# Altium PCB Tablet_Design.PcbDoc (part 4 of 6)
Units mil, origin at the board's own origin, x right, y up, seen from the top; angles counter-clockwise.
Board outline 3823 x 4035 mil, 2 copper layers (Top Layer, Bottom Layer), stack 57 mil thick; 254 components, 256 nets, 1099 pads, 445 vias.
Unrouted connection lines stored in the file: 188.
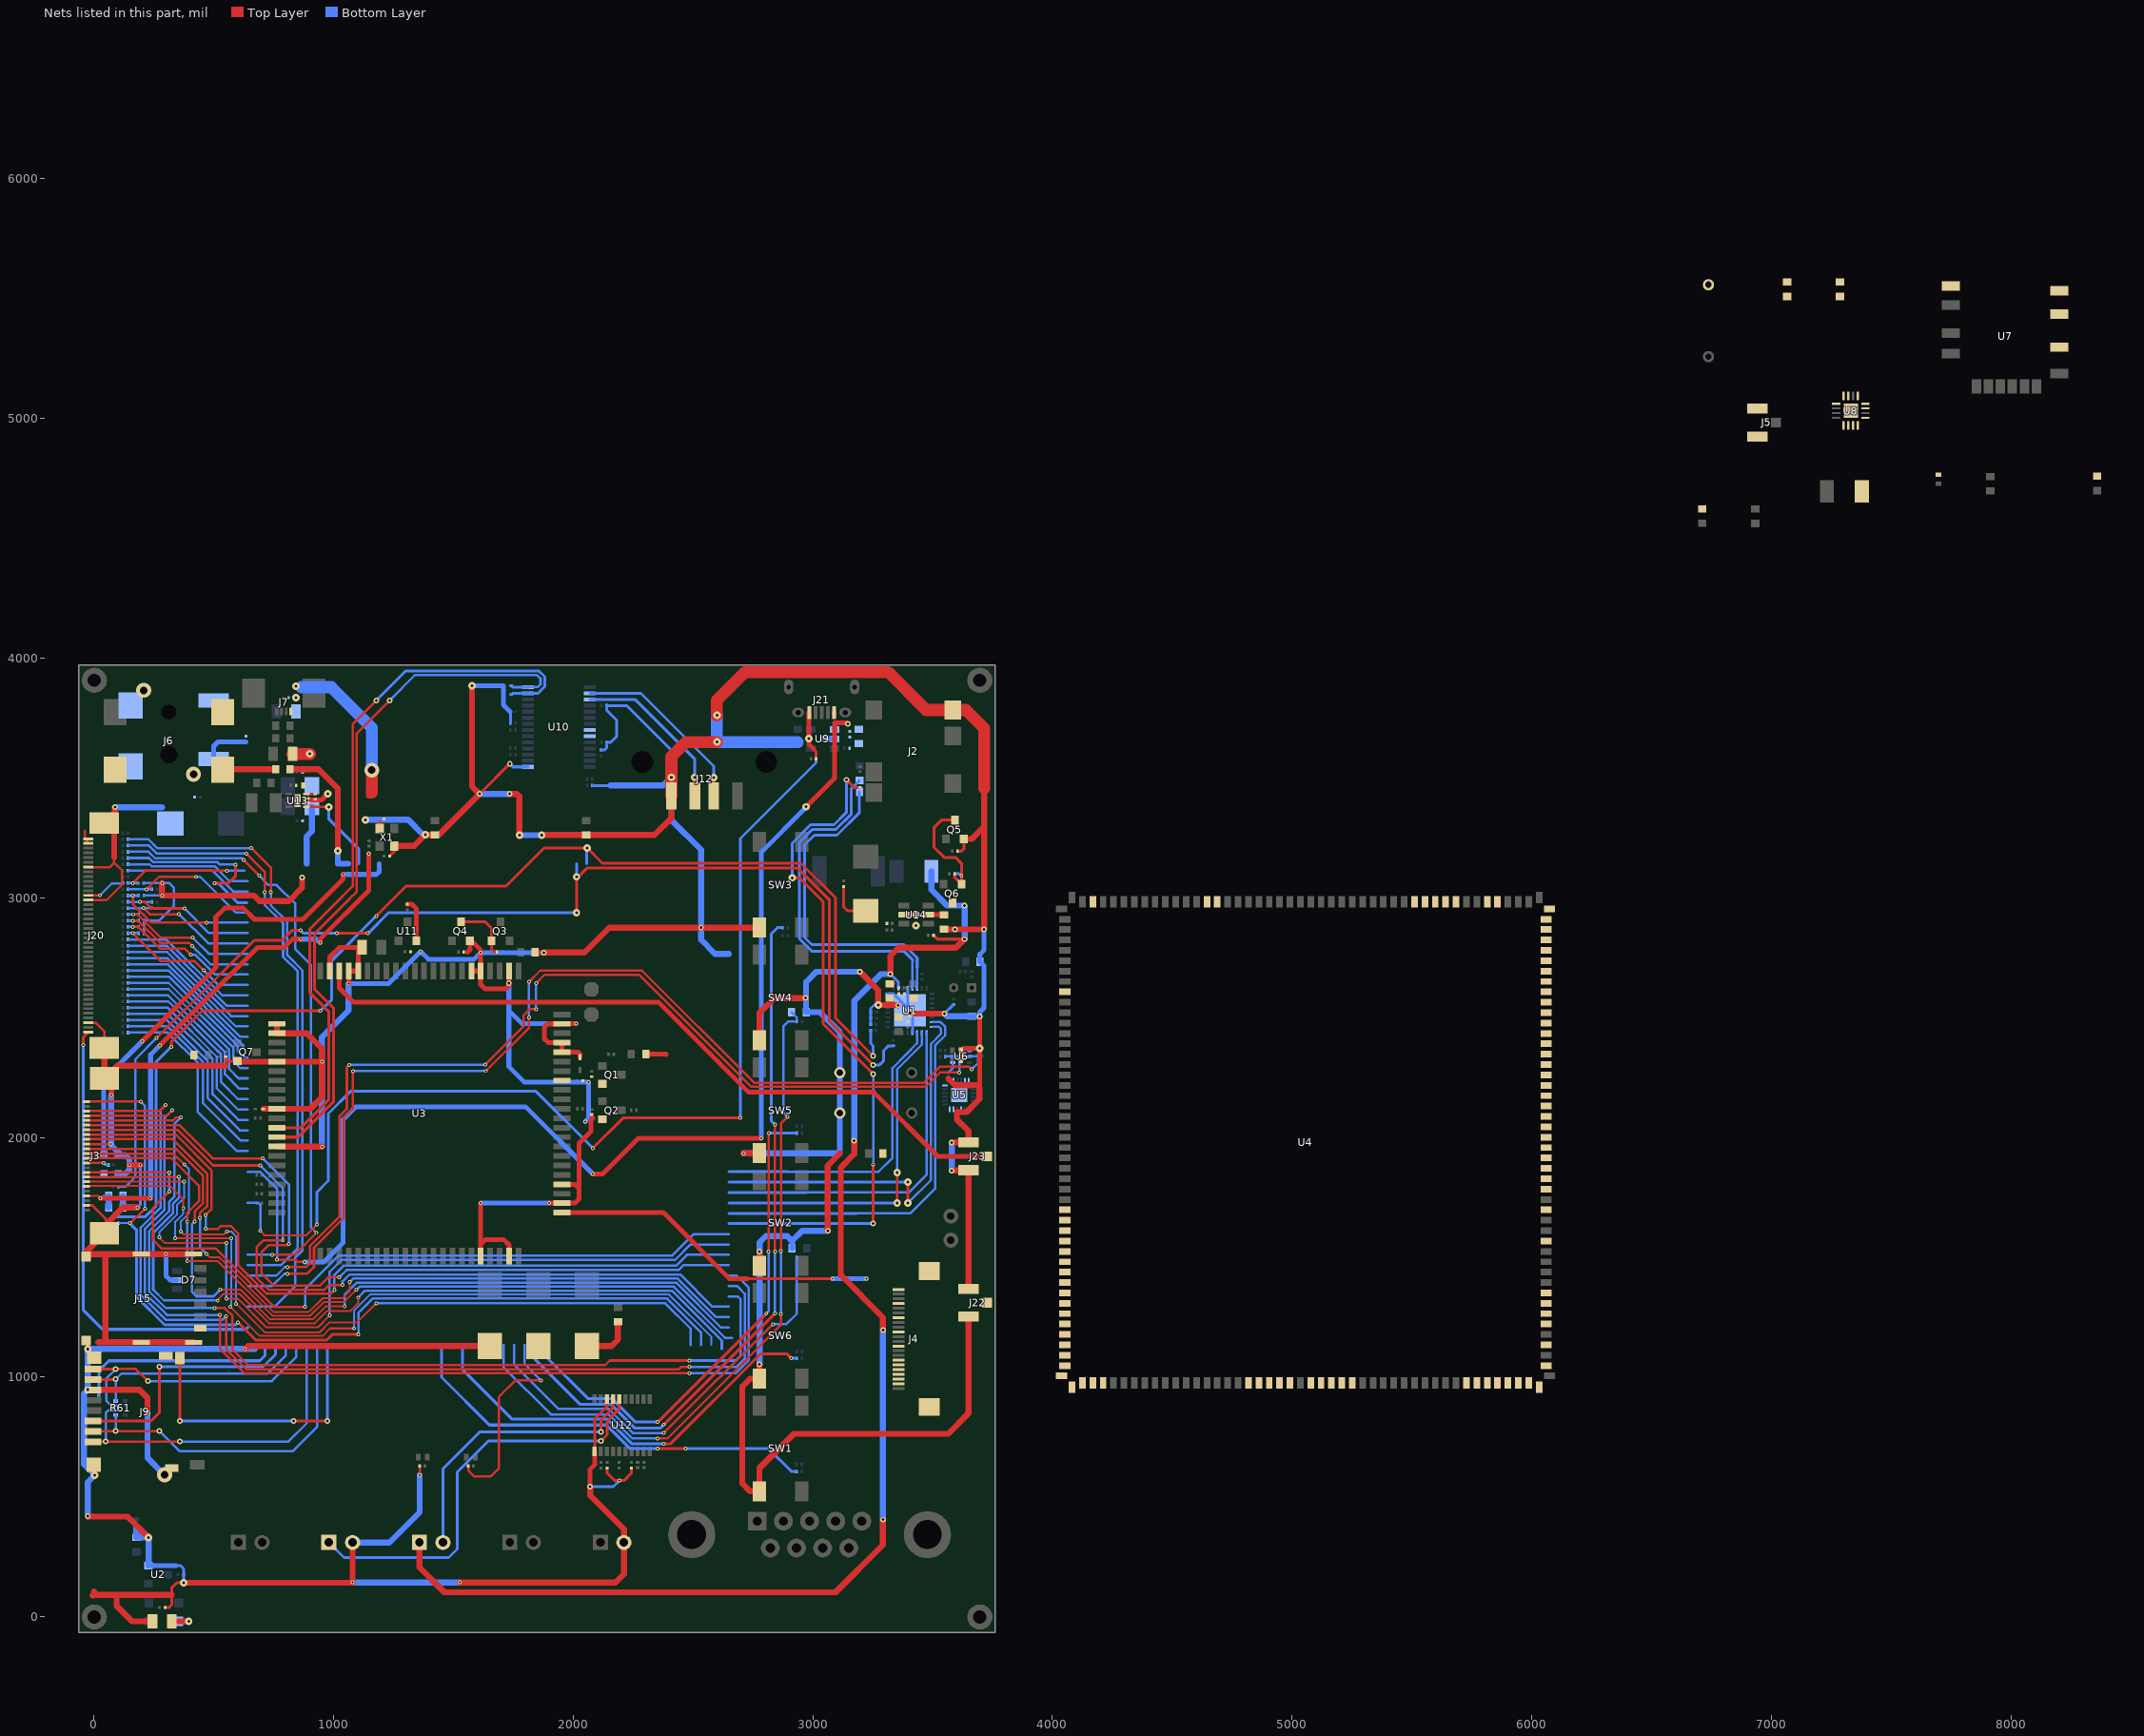
[diagram p2: the nets of this part, all layers, seen from the top]

## Part data (continued)
R7 R8 R9 R15 R17 R28 R31 R34 R36 R39 R69 R74 R89 R91 R93 R95 R97 R99 R101 R103 R131: library part RC0201FR-0710KL, "RES SMD 10K OHM 1% 1/20W 0201", Case/Package=0201, Case Code (Metric)=0603, Manufacturer=Yageo, Max Operating Temperature=125°C, Max Power Dissipation=50mW, Min Operating Temperature=-55°C, Package Quantity=1, Resistance=10kR, Supplier Part Number 1=311-10.0KMCT-ND, Temperature Coefficient=200ppm/°C, Tolerance=1%, Voltage Rating=25V, Case Code (Imperial)=0201, ComponentLink1Description=http://www.yageo.com/documents/recent/PYu-RC_Group_51_RoHS_L_10.pdf?src-supplier=Digi-Key, ComponentLink1URL=http://www.yageo.com/documents/recent/PYu-RC_Group_51_RoHS_L_10.pdf?src-supplier=Digi-Key, ComponentLink2Description=http://www.farnell.com/datasheets/2167052.pdf?src-supplier=Element14, ComponentLink2URL=http://www.farnell.com/datasheets/2167052.pdf?src-supplier=Element14, ComponentLink3Description=http://www.yageo.com/documents/recent/PYu-RC0201_51_RoHS_L_8.pdf?src-supplier=Avnet, ComponentLink3URL=http://www.yageo.com/documents/recent/PYu-RC0201_51_RoHS_L_8.pdf?src-supplier=Avnet, ComponentLink4Description=http://www.yageo.com/documents/recent/PYu-RC0201_51_RoHS_L_8.pdf?src-supplier=Avnet+Europe, ComponentLink4URL=http://www.yageo.com/documents/recent/PYu-RC0201_51_RoHS_L_8.pdf?src-supplier=Avnet+Europe, ComponentLink5Description=https://www.verical.com/server-webapp/html/getDatasheet?partID=421074&src-supplier=Verical, ComponentLink5URL=https://www.verical.com/server-webapp/html/getDatasheet?partID=421074&src-supplier=Verical, ComponentLink6Description=http://www.farnell.com/datasheets/1421516.pdf?src-supplier=Element14, ComponentLink6URL=http://www.farnell.com/datasheets/1421516.pdf?src-supplier=Element14, Composition="Thick Film", Contact Plating=Tin,Matte, Depth=0.3mm, Features="Moisture Resistant", Height=0.01inch, Lead Free="Lead Free", Length=0.6mm, Manufacturer Part Number=RC0201FR-0710KL, Military Standard=Not, Number of Pins=2, Number of Terminations=2, Packaging="Tape and Reel", Power Rating=50mW, Pricing 1="1=0.1, 10=0.042, 100=0.0171, 1000=0.00768, 2500=0.00666, 5000=0.00551 (USD)", Radiation Hardening=No, REACH SVHC="No SVHC", Stock 1=12729696, Supplier 1=Digi-Key, Termination=SMD/SMT, Voltage Rating (DC)=25V, Weight=6E-06oz, Width=0.3mm, Working Voltage=25V
R11 R16 R70 R135: library part RC0201JR-0747KL, "RES SMD 47K OHM 5% 1/20W 0201", Case/Package=0201, Case Code (Metric)=0603, Manufacturer=Yageo, Max Operating Temperature=125°C, Max Power Dissipation=50mW, Min Operating Temperature=-55°C, Package Quantity=10000, Resistance=47kR, Resistance Tolerance=5%, Resistor Type="Thick Film", Supplier Part Number 1=311-47KNCT-ND, Temperature Coefficient=200ppm/°C, Voltage Rating=25V, Case Code (Imperial)=0201, Category="Chip SMD Resistors", ComponentLink1Description=https://datasheet.ciiva.com/2492/pyu-r-int-thick-7-2492966.pdf?src-supplier=Digi-Key, ComponentLink1URL=https://datasheet.ciiva.com/2492/pyu-r-int-thick-7-2492966.pdf?src-supplier=Digi-Key, ComponentLink2Description=https://datasheet.ciiva.com/5989/1563626-5989624.pdf?src-supplier=Farnell, ComponentLink2URL=https://datasheet.ciiva.com/5989/1563626-5989624.pdf?src-supplier=Farnell, ComponentLink3Description=https://datasheet.ciiva.com/28399/pyu-rc0201-51-rohs-l-8-28399338.pdf?src-supplier=Avnet+Europe, ComponentLink3URL=https://datasheet.ciiva.com/28399/pyu-rc0201-51-rohs-l-8-28399338.pdf?src-supplier=Avnet+Europe, ComponentLink4Description=https://datasheet.ciiva.com/8889/pyu-rc0201-51-rohs-l-8-8889071.pdf?src-supplier=Avnet, ComponentLink4URL=https://datasheet.ciiva.com/8889/pyu-rc0201-51-rohs-l-8-8889071.pdf?src-supplier=Avnet, ComponentLink5Description=https://datasheet.ciiva.com/2492/pyu-r-int-thick-7-2492965.pdf?src-supplier=Digi-Key, ComponentLink5URL=https://datasheet.ciiva.com/2492/pyu-r-int-thick-7-2492965.pdf?src-supplier=Digi-Key, ComponentLink6Description=https://datasheet.ciiva.com/2492/pyu-r-int-thick-7-2492967.pdf?src-supplier=Digi-Key, ComponentLink6URL=https://datasheet.ciiva.com/2492/pyu-r-int-thick-7-2492967.pdf?src-supplier=Digi-Key, ComponentLink7Description=https://datasheet.ciiva.com/16855/pyu-rc0201-51-rohs-l-8-16855517.pdf?src-supplier=Avnet+Europe, ComponentLink7URL=https://datasheet.ciiva.com/16855/pyu-rc0201-51-rohs-l-8-16855517.pdf?src-supplier=Avnet+Europe, Construction=Rectangular, Contact Plating=Tin,Matte, Depth=0.3mm, Features="Moisture Resistant", Height=0.01inch, Lead Free="Lead Free", Length=0.6mm, Manufacturer Part Number=RC0201JR-0747KL, Military Standard=Not, Number of Pins=2, Number of Terminations=2, Packaging="Tape and Reel", Power Rating=50mW, Pricing 1="1=0.10000, 10=0.02800, 100=0.01140, 1000=0.00513, 2500=0.00445, 5000=0.00368 (USD)", Radiation Hardening=No, REACH SVHC="No SVHC", RoHS=Yes, RoHS Compliant=Yes, Series=RC, Stock 1=472205, Supplier 1=Digi-Key, Technology="THICK FILM", Termination=SMD/SMT, Tolerance=5%, Voltage Rating (DC)=25V, Width=0.3mm, Working Voltage=25V
R13 R134: library part RMCF0201FT4K70, "RES 4.7K OHM 1% 1/20W 0201", Case/Package=0201, Case Code (Metric)=0603, Manufacturer="Stackpole Electronics", Max Operating Temperature=125°C, Max Power Dissipation=50mW, Min Operating Temperature=-55°C, Resistance=4.7kR, Resistor Type="Thick Film", Supplier Part Number 1=RMCF0201FT4K70CT-ND, Temperature Coefficient=200ppm/°C, Tolerance=1%, Case Code (Imperial)=0201, Category="Chip SMD Resistors", ComponentLink1Description=https://www.seielect.com/catalog/SEI-Packaging.pdf?src-supplier=Digi-Key, ComponentLink1URL=https://www.seielect.com/catalog/SEI-Packaging.pdf?src-supplier=Digi-Key, ComponentLink2Description=https://www.seielect.com/catalog/SEI-RMCF_RMCP.pdf?src-supplier=Avnet, ComponentLink2URL=https://www.seielect.com/catalog/SEI-RMCF_RMCP.pdf?src-supplier=Avnet, Contact Plating=Tin,Matte, Height=0.009inch, Length=0.024inch, Manufacturer Part Number=RMCF0201FT4K70, Mount="Surface Mount", Number of Terminations=2, Packaging="Tape and Reel", Pricing 1="1=0.10000, 10=0.02300, 100=0.00940, 1000=0.00424, 2500=0.00368, 5000=0.00304 (USD)", Radiation Hardening=No, RoHS=Yes, Stock 1=325193, Supplier 1=Digi-Key, Width=0.012inch
R14: library part ERJ-1GNJ301C, "RES SMD 300 OHM 5% 1/20W 0201", Case/Package=0201, Case Code (Metric)=0603, Manufacturer=Panasonic, Max Operating Temperature=125°C, Max Power Dissipation=50mW, Min Operating Temperature=-55°C, Package Quantity=15000, Resistor Type="Thick Film", Supplier Part Number 1=P123298CT-ND, Temperature Coefficient=200ppm/°C, Tolerance=5%, Voltage Rating=25V, Case Code (Imperial)=0201, Category="Chip SMD Resistors", ComponentLink1Description=http://www.mouser.com/ds/2/315/AOA0000C84-947596.pdf?src-supplier=Mouser, ComponentLink1URL=http://www.mouser.com/ds/2/315/AOA0000C84-947596.pdf?src-supplier=Mouser, ComponentLink2Description=http://www.onlinecomponents.com/datasheet/erj-1gnj301c.aspx?p=44467777&src-supplier=Onlinecomponents.com, ComponentLink2URL=http://www.onlinecomponents.com/datasheet/erj-1gnj301c.aspx?p=44467777&src-supplier=Onlinecomponents.com, ComponentLink3Description=https://industrial.panasonic.com/cdbs/www-data/pdf/RDM0000/DMM0000COL11.pdf?src-supplier=Digi-Key, ComponentLink3URL=https://industrial.panasonic.com/cdbs/www-data/pdf/RDM0000/DMM0000COL11.pdf?src-supplier=Digi-Key, ComponentLink4Description=https://b2b-api.panasonic.eu/file_stream/pids/fileversion/1242?src-supplier=Digi-Key, ComponentLink4URL=https://b2b-api.panasonic.eu/file_stream/pids/fileversion/1242?src-supplier=Digi-Key, ComponentLink5Description=http://industrial.panasonic.com/www-cgi/jvcr13pz.cgi?E+PZ+3+AOA0002+ERJ1GNJ301C+7+WW?src-supplier=Digi-Key, ComponentLink5URL=http://industrial.panasonic.com/www-cgi/jvcr13pz.cgi?E+PZ+3+AOA0002+ERJ1GNJ301C+7+WW?src-supplier=Digi-Key, Contact Plating=Tin, Height=0.01inch, Length=0.024inch, Manufacturer Part Number=ERJ-1GNJ301C, Mount="Surface Mount", Number of Terminations=2, Packaging="Tape and Reel", Power Rating=50mW, Pricing 1="1=0.10000, 10=0.02800, 100=0.01150, 1000=0.00518, 2500=0.00450, 5000=0.00371 (USD)", Resistance=300R, RoHS=Yes, Stock 1=65293, Supplier 1=Digi-Key, Termination=SMD/SMT, Weight=6E-06oz, Width=0.012inch
R18 R68 R73 R128 R130 R133: library part RC0201JR-07100KL, "RES SMD 100K OHM 5% 1/20W 0201"
R19 R132: library part AC0201FR-075K1L, "RES SMD 5.1K OHM 1% 1/20W 0201", Case/Package=0201, Manufacturer=Yageo, Max Operating Temperature=155°C, Max Power Dissipation=50mW, Min Operating Temperature=-55°C, Resistance=5.1kR, Resistor Type="Thick Film", Supplier Part Number 1=YAG5228CT-ND, Temperature Coefficient=200ppm/°C, Tolerance=1%, Category="Chip SMD Resistors", ComponentLink1Description=http://www.yageo.com/NewPortal/yageodocoutput?fileName=/pdf/R-Chip/PYu-AC_51_RoHS_L_6.pdf&src-supplier=Digi-Key, ComponentLink1URL=http://www.yageo.com/NewPortal/yageodocoutput?fileName=/pdf/R-Chip/PYu-AC_51_RoHS_L_6.pdf&src-supplier=Digi-Key, ComponentLink2Description=http://www.yageo.com/NewPortal/yageodocoutput?fileName=/pdf/R-Chip/PYu-AC_51_RoHS_L_5.pdf&src-supplier=Digi-Key, ComponentLink2URL=http://www.yageo.com/NewPortal/yageodocoutput?fileName=/pdf/R-Chip/PYu-AC_51_RoHS_L_5.pdf&src-supplier=Digi-Key, Features="Moisture Resistant,Automotive AEC-Q200", Height=0.01inch, Length=0.024inch, Manufacturer Part Number=AC0201FR-075K1L, Number of Terminations=2, Packaging="Tape and Reel", Pricing 1="1=0.10000, 10=0.06300, 100=0.02560, 1000=0.01149, 2500=0.00997, 5000=0.00823 (USD)", RoHS=Yes, RoHS Compliant=Yes, Stock 1=2998, Supplier 1=Digi-Key, Width=0.012inch
R23 R82: library part RC0201JR-07470RL, "RES SMD 470 OHM 5% 1/20W 0201", Case/Package=0201, Case Code (Metric)=0603, Manufacturer=Yageo, Max Operating Temperature=125°C, Max Power Dissipation=50mW, Min Operating Temperature=-55°C, Package Quantity=1, Supplier Part Number 1=311-470NCT-ND, Temperature Coefficient=200ppm/°C, Tolerance=5%, Voltage Rating=25V, Case Code (Imperial)=0201, ComponentLink1Description=http://www.farnell.com/datasheets/443682.pdf?src-supplier=Farnell, ComponentLink1URL=http://www.farnell.com/datasheets/443682.pdf?src-supplier=Farnell, ComponentLink2Description=http://www.yageo.com/documents/recent/PYu-RC0201_51_RoHS_L_8.pdf?src-supplier=Avnet, ComponentLink2URL=http://www.yageo.com/documents/recent/PYu-RC0201_51_RoHS_L_8.pdf?src-supplier=Avnet, ComponentLink3Description=http://www.yageo.com/documents/recent/PYu-RC_Group_51_RoHS_L_9.pdf?src-supplier=Digi-Key, ComponentLink3URL=http://www.yageo.com/documents/recent/PYu-RC_Group_51_RoHS_L_9.pdf?src-supplier=Digi-Key, ComponentLink4Description=http://www.yageo.com/documents/recent/PYu-RC_Group_51_RoHS_L_10.pdf?src-supplier=Digi-Key, ComponentLink4URL=http://www.yageo.com/documents/recent/PYu-RC_Group_51_RoHS_L_10.pdf?src-supplier=Digi-Key, ComponentLink5Description=http://www.yageo.com.tw/exep/pages/download/literatures/PYu-R_INT-thick_7.pdf?src-supplier=Digi-Key, ComponentLink5URL=http://www.yageo.com.tw/exep/pages/download/literatures/PYu-R_INT-thick_7.pdf?src-supplier=Digi-Key, ComponentLink6Description=http://www.yageo.com/documents/recent/PYu-RC0201_51_RoHS_L_8.pdf?src-supplier=Avnet+Europe, ComponentLink6URL=http://www.yageo.com/documents/recent/PYu-RC0201_51_RoHS_L_8.pdf?src-supplier=Avnet+Europe, Composition="Thick Film", Contact Plating=Tin,Matte, Depth=0.3mm, Features="Moisture Resistant", Height=0.01inch, Lead Free="Lead Free", Length=0.6mm, Manufacturer Part Number=RC0201JR-07470RL, Military Standard=Not, Number of Pins=2, Number of Terminations=2, Packaging="Tape and Reel", Power Rating=50mW, Pricing 1="1=0.1, 10=0.028, 100=0.0115, 1000=0.00517, 2500=0.00448, 5000=0.00371 (USD)", Radiation Hardening=No, REACH SVHC="No SVHC", Resistance=470R, Stock 1=101994, Supplier 1=Digi-Key, Termination=SMD/SMT, Voltage Rating (DC)=25V, Width=0.3mm
R27: library part AC0201FR-0733RL, "RES SMD 33 OHM 1% 1/20W 0201", Case/Package=0201, Case Code (Metric)=0603, Manufacturer=Yageo, Max Operating Temperature=155°C, Max Power Dissipation=50mW, Min Operating Temperature=-55°C, Resistor Type="Thick Film", Supplier Part Number 1=YAG3424CT-ND, Temperature Coefficient=200ppm/°C, Tolerance=1%, Case Code (Imperial)=0201, Category="Chip SMD Resistors", ComponentLink1Description=http://www.yageo.com/NewPortal/yageodocoutput?fileName=/pdf/R-Chip/PYu-AC_51_RoHS_L_6.pdf&src-supplier=Digi-Key, ComponentLink1URL=http://www.yageo.com/NewPortal/yageodocoutput?fileName=/pdf/R-Chip/PYu-AC_51_RoHS_L_6.pdf&src-supplier=Digi-Key, Features="Moisture Resistant,Automotive AEC-Q200", Height=0.01inch, Length=0.024inch, Manufacturer Part Number=AC0201FR-0733RL, Number of Terminations=2, Packaging="Tape and Reel", Pricing 1="1=0.10000, 10=0.06300, 100=0.02560, 1000=0.01149, 2500=0.00997, 5000=0.00823 (USD)", Resistance=33R, RoHS=Yes, RoHS Compliant=Yes, Stock 1=119363, Supplier 1=Digi-Key, Width=0.012inch
R38 R40: library part AC0201JR-072K2L, "RES SMD 2.2K OHM 5% 1/20W 0201", Case/Package=0201, Case Code (Metric)=0603, Manufacturer=Yageo, Max Operating Temperature=155°C, Max Power Dissipation=50mW, Min Operating Temperature=-55°C, Resistance=2.2kR, Resistor Type="Thick Film", Supplier Part Number 1=YAG3433CT-ND, Temperature Coefficient=200ppm/°C, Tolerance=5%, Case Code (Imperial)=0201, Category="Chip SMD Resistors", ComponentLink1Description=http://www.yageo.com/NewPortal/yageodocoutput?fileName=/pdf/R-Chip/PYu-AC_51_RoHS_L_6.pdf&src-supplier=Digi-Key, ComponentLink1URL=http://www.yageo.com/NewPortal/yageodocoutput?fileName=/pdf/R-Chip/PYu-AC_51_RoHS_L_6.pdf&src-supplier=Digi-Key, Features="Moisture Resistant,Automotive AEC-Q200", Height=0.01inch, Length=0.024inch, Manufacturer Part Number=AC0201JR-072K2L, Number of Terminations=2, Packaging="Tape and Reel", Pricing 1="1=0.10000, 10=0.04700, 100=0.01910, 1000=0.00860, 2500=0.00746, 5000=0.00617 (USD)", RoHS=Yes, RoHS Compliant=Yes, Stock 1=106991, Supplier 1=Digi-Key, Width=0.012inch
R61: library part CAY10-473J4LF, "RES ARRAY 4 RES 47K OHM 0804", Case/Package=0804, Case Code (Metric)=2010, Manufacturer=Bourns, Max Operating Temperature=125°C, Min Operating Temperature=-55°C, Number of Resistors=4, Package Quantity=1, Power Per Element=62.5mW, Power Rating=125mW, Resistance=47kR, Resistance Tolerance=5%, Supplier Part Number 1=CAY10-473J4LFCT-ND, Temperature Coefficient=250ppm/°C, Voltage Rating=25V, Case Code (Imperial)=0804, Category="Resistor Arrays", Circuit Type=Isolated, ComponentLink1Description=https://datasheet.ciiva.com/11807/0900766b8064e463-11807137.pdf?src-supplier=RSComponents, ComponentLink1URL=https://datasheet.ciiva.com/11807/0900766b8064e463-11807137.pdf?src-supplier=RSComponents, ComponentLink2Description=https://datasheet.ciiva.com/6494/cay10-6494182.pdf?src-supplier=Digi-Key, ComponentLink2URL=https://datasheet.ciiva.com/6494/cay10-6494182.pdf?src-supplier=Digi-Key, ComponentLink3Description=https://datasheet.ciiva.com/16965/cay10-16965867.pdf?src-supplier=Avnet+Europe, ComponentLink3URL=https://datasheet.ciiva.com/16965/cay10-16965867.pdf?src-supplier=Avnet+Europe, ComponentLink4Description=https://datasheet.ciiva.com/22712/467939-22712716.pdf?src-supplier=Element14, ComponentLink4URL=https://datasheet.ciiva.com/22712/467939-22712716.pdf?src-supplier=Element14, ComponentLink5Description=https://datasheet.ciiva.com/6494/cay10-6494183.pdf?src-supplier=Digi-Key, ComponentLink5URL=https://datasheet.ciiva.com/6494/cay10-6494183.pdf?src-supplier=Digi-Key, ComponentLink6Description=https://datasheet.ciiva.com/6494/cay10-6494184.pdf?src-supplier=Digi-Key, ComponentLink6URL=https://datasheet.ciiva.com/6494/cay10-6494184.pdf?src-supplier=Digi-Key, ComponentLink7Description=https://datasheet.ciiva.com/8370/cay10-8370974.pdf?src-supplier=Avnet, ComponentLink7URL=https://datasheet.ciiva.com/8370/cay10-8370974.pdf?src-supplier=Avnet, ComponentLink8Description=https://datasheet.ciiva.com/48692/001055368-da-01-en-wid-arr-cay10-473j4lf-47k-ohm-4-w-0804-48692103.pdf?src-supplier=Conrad, ComponentLink8URL=https://datasheet.ciiva.com/48692/001055368-da-01-en-wid-arr-cay10-473j4lf-47k-ohm-4-w-0804-48692103.pdf?src-supplier=Conrad, Contact Plating=Tin, Depth=1mm, Height=0.018inch, Length=2mm, Manufacturer Part Number=CAY10-473J4LF, Military Standard=Not, Mount="Surface Mount", Number of Elements=4, Number of Pins=8, Number of Terminals/Pins=8, Packaging="Tape and Reel", Pricing 1="1=0.12000, 10=0.10400, 25=0.07200, 50=0.05600, 100=0.04000, 250=0.03120, 500=0.02480, 1000=0.01760, 5000=0.01360 (USD)", REACH SVHC="No SVHC", RoHS=Yes, RoHS Compliant=Yes, Series=CAY10, Stock 1=11037, Supplier 1=Digi-Key, Technology="THICK FILM", Terminal Pitch=0.5mm, Termination=Convex, Tolerance=5%, Voltage Rating (DC)=25V, Width=0.039inch
R66: library part AC0201FR-076K8L, "RES SMD 6.8K OHM 1% 1/20W 0201", Case/Package=0201, Manufacturer=Yageo, Max Operating Temperature=155°C, Max Power Dissipation=50mW, Min Operating Temperature=-55°C, Resistance=6.8kR, Resistor Type="Thick Film", Supplier Part Number 1=YAG5238CT-ND, Temperature Coefficient=200ppm/°C, Tolerance=1%, Category="Chip SMD Resistors", ComponentLink1Description=http://www.yageo.com/NewPortal/yageodocoutput?fileName=/pdf/R-Chip/PYu-AC_51_RoHS_L_6.pdf&src-supplier=Digi-Key, ComponentLink1URL=http://www.yageo.com/NewPortal/yageodocoutput?fileName=/pdf/R-Chip/PYu-AC_51_RoHS_L_6.pdf&src-supplier=Digi-Key, ComponentLink2Description=http://www.yageo.com/NewPortal/yageodocoutput?fileName=/pdf/R-Chip/PYu-AC_51_RoHS_L_5.pdf&src-supplier=Digi-Key, ComponentLink2URL=http://www.yageo.com/NewPortal/yageodocoutput?fileName=/pdf/R-Chip/PYu-AC_51_RoHS_L_5.pdf&src-supplier=Digi-Key, Features="Moisture Resistant,Automotive AEC-Q200", Height=0.01inch, Length=0.024inch, Manufacturer Part Number=AC0201FR-076K8L, Number of Terminations=2, Packaging="Tape and Reel", Pricing 1="1=0.10000, 10=0.06300, 100=0.02560, 1000=0.01149, 2500=0.00997, 5000=0.00823 (USD)", RoHS=Yes, RoHS Compliant=Yes, Stock 1=17901, Supplier 1=Digi-Key, Width=0.012inch
R67: library part RC0201FR-071KL, "RES SMD 1K OHM 1% 1/20W 0201", Case/Package=0201, Case Code (Metric)=0603, Manufacturer=Yageo, Max Operating Temperature=125°C, Max Power Dissipation=50mW, Min Operating Temperature=-55°C, Package Quantity=10000, Resistance=1kR, Supplier Part Number 1=311-1KMCT-ND, Temperature Coefficient=200ppm/°C, Tolerance=1%, Voltage Rating=25V, Case Code (Imperial)=0201, ComponentLink1Description=http://www.yageo.com/documents/recent/PYu-RC0201_51_RoHS_L_8.pdf?src-supplier=Avnet+Europe, ComponentLink1URL=http://www.yageo.com/documents/recent/PYu-RC0201_51_RoHS_L_8.pdf?src-supplier=Avnet+Europe, ComponentLink2Description=http://www.farnell.com/datasheets/2167052.pdf?src-supplier=Element14, ComponentLink2URL=http://www.farnell.com/datasheets/2167052.pdf?src-supplier=Element14, ComponentLink3Description=http://www.yageo.com/documents/recent/PYu-RC_Group_51_RoHS_L_10.pdf?src-supplier=Digi-Key, ComponentLink3URL=http://www.yageo.com/documents/recent/PYu-RC_Group_51_RoHS_L_10.pdf?src-supplier=Digi-Key, ComponentLink4Description=http://www.yageo.com/documents/recent/PYu-RC0201_51_RoHS_L_8.pdf?src-supplier=Avnet, ComponentLink4URL=http://www.yageo.com/documents/recent/PYu-RC0201_51_RoHS_L_8.pdf?src-supplier=Avnet, Composition="Thick Film", Contact Plating=Tin,Matte, Depth=0.3mm, Features="Moisture Resistant", Height=0.01inch, Lead Free="Lead Free", Length=0.024inch, Manufacturer Part Number=RC0201FR-071KL, Military Standard=Not, Number of Terminations=2, Packaging="Tape and Reel", Power Rating=50mW, Pricing 1="1=0.1, 10=0.04, 100=0.0165, 1000=0.00739, 2500=0.00642, 5000=0.0053 (USD)", Radiation Hardening=No, REACH SVHC=Unknown, Stock 1=3437969, Supplier 1=Digi-Key, Termination=SMD/SMT, Width=0.012inch, Working Voltage=25V
R72: library part RC0201FR-07510KL, "RES SMD 510K OHM 1% 1/20W 0201", Case/Package=0201, Case Code (Metric)=0603, Manufacturer=Yageo, Max Operating Temperature=125°C, Max Power Dissipation=50mW, Min Operating Temperature=-55°C, Resistance=510kR, Resistor Type="Thick Film", Supplier Part Number 1=YAG2713CT-ND, Temperature Coefficient=200ppm/°C, Tolerance=1%, Case Code (Imperial)=0201, Category="Chip SMD Resistors", ComponentLink1Description=http://components.arrow.com/part/dataview/0323_03301050?src-supplier=Arrow+Europe, ComponentLink1URL=http://components.arrow.com/part/dataview/0323_03301050?src-supplier=Arrow+Europe, ComponentLink2Description=http://www.yageo.com.tw/exep/pages/download/literatures/PYu-R_INT-thick_7.pdf?src-supplier=Digi-Key, ComponentLink2URL=http://www.yageo.com.tw/exep/pages/download/literatures/PYu-R_INT-thick_7.pdf?src-supplier=Digi-Key, ComponentLink3Description=http://www.yageo.com/documents/recent/PYu-RC_Group_51_RoHS_L_9.pdf?src-supplier=Digi-Key, ComponentLink3URL=http://www.yageo.com/documents/recent/PYu-RC_Group_51_RoHS_L_9.pdf?src-supplier=Digi-Key, Depth=0.3mm, Features="Moisture Resistant", Height=0.01inch, Lead Free="Lead Free", Length=0.024inch, Manufacturer Part Number=RC0201FR-07510KL, Military Standard=Not, Number of Terminations=2, Packaging="Tape and Reel", Pricing 1="1=0.10000, 10=0.04000, 100=0.01630, 1000=0.00732, 2500=0.00635, 5000=0.00525 (USD)", RoHS=Yes, RoHS Compliant=Yes, Stock 1=1654, Supplier 1=Digi-Key, Width=0.012inch
R75: library part RC0201FR-0720KL, "RES SMD 20K OHM 1% 1/20W 0201", Case/Package=0201, Case Code (Metric)=0603, Manufacturer=Yageo, Max Operating Temperature=125°C, Max Power Dissipation=50mW, Min Operating Temperature=-55°C, Package Quantity=10000, Resistance=20kR, Supplier Part Number 1=YAG2276CT-ND, Temperature Coefficient=200ppm/°C, Tolerance=1%, Voltage Rating=25V, Case Code (Imperial)=0201, ComponentLink1Description=http://www.yageo.com.tw/exep/pages/download/literatures/PYu-R_INT-thick_7.pdf?src-supplier=Digi-Key, ComponentLink1URL=http://www.yageo.com.tw/exep/pages/download/literatures/PYu-R_INT-thick_7.pdf?src-supplier=Digi-Key, Composition="Thick Film", Depth=0.3mm, Features="Moisture Resistant", Height=0.01inch, Lead Free="Lead Free", Length=0.024inch, Manufacturer Part Number=RC0201FR-0720KL, Military Standard=Not, Number of Terminations=2, Packaging="Tape and Reel", Power Rating=50mW, Pricing 1="1=0.1, 10=0.042, 100=0.0171, 1000=0.00768, 2500=0.00666, 5000=0.00551 (USD)", Stock 1=1339619, Supplier 1=Digi-Key, Termination=SMD/SMT, Width=0.012inch
R76: library part RC0201JR-071M1L, "RES SMD 1.1M OHM 5% 1/20W 0201", Case/Package=0201, Case Code (Metric)=0603, Manufacturer=Yageo, Max Operating Temperature=125°C, Max Power Dissipation=50mW, Min Operating Temperature=-55°C, Resistance=1.1MR, Resistor Type="Thick Film", Supplier Part Number 1=YAG2868CT-ND, Temperature Coefficient=200ppm/°C, Tolerance=5%, Case Code (Imperial)=0201, Category="Chip SMD Resistors", ComponentLink1Description=http://www.yageo.com.tw/exep/pages/download/literatures/PYu-R_INT-thick_7.pdf?src-supplier=Digi-Key, ComponentLink1URL=http://www.yageo.com.tw/exep/pages/download/literatures/PYu-R_INT-thick_7.pdf?src-supplier=Digi-Key, Features="Moisture Resistant", Height=0.01inch, Length=0.024inch, Manufacturer Part Number=RC0201JR-071M1L, Number of Terminations=2, Packaging="Tape and Reel", Pricing 1="1=0.10000, 10=0.02800, 100=0.01140, 1000=0.00513, 2500=0.00445, 5000=0.00368 (USD)", RoHS=Yes, RoHS Compliant=Yes, Stock 1=9936, Supplier 1=Digi-Key, Width=0.012inch
R77 R78 R79 R80: library part TNPW020150R0DEED, "TNPW0201 50R 0.5% T-9 ET7 E3", Manufacturer="Vishay Dale", Supplier Part Number 1=MP9403EN-LF-ND, Manufacturer Part Number=TNPW020150R0DEED, RoHS=Yes, Supplier 1=Digi-Key
R85 R86 R87 R88 R90 R92 R94 R96 R98 R100 R102 R104 R105 R106 R107 R108 R109 R110 R111 R112 R113 R114 R115 R116 R118 R120 R121 R122 R123 R124 R125: library part AC0201FR-0722RL, "RES SMD 22 OHM 1% 1/20W 0201", Case/Package=0201, Case Code (Metric)=0603, Manufacturer=Yageo, Max Operating Temperature=155°C, Max Power Dissipation=50mW, Min Operating Temperature=-55°C, Resistor Type="Thick Film", Supplier Part Number 1=YAG3420CT-ND, Temperature Coefficient=200ppm/°C, Tolerance=1%, Case Code (Imperial)=0201, Category="Chip SMD Resistors", ComponentLink1Description=http://www.yageo.com/NewPortal/yageodocoutput?fileName=/pdf/R-Chip/PYu-AC_51_RoHS_L_6.pdf&src-supplier=Digi-Key, ComponentLink1URL=http://www.yageo.com/NewPortal/yageodocoutput?fileName=/pdf/R-Chip/PYu-AC_51_RoHS_L_6.pdf&src-supplier=Digi-Key, Features="Moisture Resistant,Automotive AEC-Q200", Height=0.01inch, Length=0.024inch, Manufacturer Part Number=AC0201FR-0722RL, Number of Terminations=2, Packaging="Tape and Reel", Pricing 1="1=0.10000, 10=0.06300, 100=0.02560, 1000=0.01149, 2500=0.00997, 5000=0.00823 (USD)", Resistance=22R, RoHS=Yes, RoHS Compliant=Yes, Stock 1=35550, Supplier 1=Digi-Key, Width=0.012inch
R126: library part RMCF0201FT402K, "RES 402K OHM 1% 1/20W 0201", Case/Package=0201, Case Code (Metric)=0603, Manufacturer="Stackpole Electronics", Max Operating Temperature=125°C, Max Power Dissipation=50mW, Min Operating Temperature=-55°C, Resistance=402kR, Resistor Type="Thick Film", Supplier Part Number 1=RMCF0201FT402KCT-ND, Temperature Coefficient=200ppm/°C, Tolerance=1%, Case Code (Imperial)=0201, Category="Chip SMD Resistors", ComponentLink1Description=https://www.seielect.com/catalog/SEI-RMCF_RMCP.pdf?src-supplier=Avnet, ComponentLink1URL=https://www.seielect.com/catalog/SEI-RMCF_RMCP.pdf?src-supplier=Avnet, ComponentLink2Description=https://www.seielect.com/Catalog/SEI-RMCF_RMCP.pdf?src-supplier=Digi-Key, ComponentLink2URL=https://www.seielect.com/Catalog/SEI-RMCF_RMCP.pdf?src-supplier=Digi-Key, Contact Plating=Tin,Matte, Height=0.009inch, Length=0.024inch, Manufacturer Part Number=RMCF0201FT402K, Mount="Surface Mount", Number of Terminations=2, Packaging="Tape and Reel", Pricing 1="1=0.10000, 10=0.02700, 100=0.01090, 1000=0.00488, 2500=0.00423, 5000=0.00350 (USD)", Radiation Hardening=No, RoHS=Yes, RoHS Compliant=Yes, Series=RMCF, Stock 1=4361, Supplier 1=Digi-Key, Width=0.012inch
R127: library part RC0201FR-07270KL, "RES SMD 270K OHM 1% 1/20W 0201", Case/Package=0201, Case Code (Metric)=0603, Manufacturer=Yageo, Max Operating Temperature=125°C, Max Power Dissipation=50mW, Min Operating Temperature=-55°C, Resistance=270kR, Resistance Tolerance=1%, Resistor Type="Thick Film", Supplier Part Number 1=YAG2548CT-ND, Temperature Coefficient=200ppm/°C, Voltage Rating=25V, Case Code (Imperial)=0201, Category="Chip SMD Resistors", ComponentLink1Description=https://datasheet.ciiva.com/7672/1563626-7672216.pdf?src-supplier=Element14, ComponentLink1URL=https://datasheet.ciiva.com/7672/1563626-7672216.pdf?src-supplier=Element14, Features="Moisture Resistant", Height=0.01inch, Length=0.024inch, Manufacturer Part Number=RC0201FR-07270KL, Number of Terminations=2, Packaging="Tape and Reel", Power Rating=50mW, Pricing 1="1=0.10000, 10=0.04200, 100=0.01700, 1000=0.00765, 2500=0.00664, 5000=0.00548 (USD)", REACH SVHC=Unknown, RoHS=Yes, RoHS Compliant=Yes, Series=RC, Stock 1=96171, Supplier 1=Digi-Key, Termination=SMD/SMT, Tolerance=1%, Width=0.012inch
R129: library part RC0201FR-07536KL, "RES SMD 536K OHM 1% 1/20W 0201", Case/Package=0201, Case Code (Metric)=0603, Manufacturer=Yageo, Max Operating Temperature=125°C, Max Power Dissipation=50mW, Min Operating Temperature=-55°C, Resistance=536kR, Resistor Type="Thick Film", Supplier Part Number 1=YAG2720CT-ND, Temperature Coefficient=200ppm/°C, Tolerance=1%, Case Code (Imperial)=0201, Category="Chip SMD Resistors", ComponentLink1Description=http://www.yageo.com.tw/exep/pages/download/literatures/PYu-R_INT-thick_7.pdf?src-supplier=Digi-Key, ComponentLink1URL=http://www.yageo.com.tw/exep/pages/download/literatures/PYu-R_INT-thick_7.pdf?src-supplier=Digi-Key, ComponentLink2Description=http://www.yageo.com/documents/recent/PYu-RC_Group_51_RoHS_L_9.pdf?src-supplier=Digi-Key, ComponentLink2URL=http://www.yageo.com/documents/recent/PYu-RC_Group_51_RoHS_L_9.pdf?src-supplier=Digi-Key, Features="Moisture Resistant", Height=0.01inch, Length=0.024inch, Manufacturer Part Number=RC0201FR-07536KL, Number of Terminations=2, Packaging="Tape and Reel", Pricing 1="1=0.10000, 10=0.04000, 100=0.01630, 1000=0.00732, 2500=0.00635, 5000=0.00525 (USD)", RoHS=Yes, RoHS Compliant=Yes, Stock 1=8842, Supplier 1=Digi-Key, Width=0.012inch
SB1 SB2 SB3 SB4 SB5 SB6 SB9 SB10: "Solder Bridge ON"
SW1 SW2 SW3 SW4 SW5 SW6: library part TL3301NF160QG/TR, "SWITCH TACTILE SPST-NO 0.05A 12V", Manufacturer=E-Switch, Package="SMD (6.00mm x 6.00mm)", Manufacturer Part No=TL3301NF160QG/TR
U1: "Single I2S/PCM Interface, Stereo, 2.3W Mono Amp, 45mW Headphone Amp", Manufacturer=Realtek, Manufacturer Part No=ALC5621-GR, Package=QFN-32
U2 U11: "IC REG LINEAR 1.8V 250MA SOT23-3", Manufacturer=ABLIC, Supplier Part Number 1=1662-1438-1-ND, Manufacturer Part Number=S-1206B18-M3T1U, Pricing 1="1=0.92000, 10=0.80800, 25=0.75960, 100=0.57580, 250=0.49000, 500=0.46550 (USD)", Stock 1=577, Supplier 1=Digi-Key
U3: "RF Components", Package=None, Availability=Unavailable, MF=Simcom, MP="SIM7100A S2-10671", Price=None, SnapEDA_Link=https://www.snapeda.com/parts/SIM7100A%20S2-10671/SIMcom%20Wireless%20solutions%20Co.%2CLtd/view-part/796159/?ref=snap
U4: "S5P4418 Quad Core Android SoM System on Module", Manufacturer=Samsung, Package=Custom, Manufacturer Part No=S5P4418
U5: "IMU ACCEL/GYRO/COMPI2C/SPI 24QFN", Case/Package=QFN, Manufacturer="TDK InvenSense", Max Operating Temperature=85°C, Min Operating Temperature=-40°C, Category="Inertial Measurement Units (IMUs)", ComponentLink1Description=http://www.farnell.com/datasheets/2632662.pdf?src-supplier=Farnell, ComponentLink1URL=http://www.farnell.com/datasheets/2632662.pdf?src-supplier=Farnell, ComponentLink2Description=https://www.invensense.com/wp-content/uploads/2016/06/App-Note-eMD-20x48-User-Guide.pdf?src-supplier=Avnet+Europe, ComponentLink2URL=https://www.invensense.com/wp-content/uploads/2016/06/App-Note-eMD-20x48-User-Guide.pdf?src-supplier=Avnet+Europe, ComponentLink3Description=https://www.invensense.com/wp-content/uploads/2016/06/App-Note-eMD-20x48-User-Guide.pdf?src-supplier=Digi-Key, ComponentLink3URL=https://www.invensense.com/wp-content/uploads/2016/06/App-Note-eMD-20x48-User-Guide.pdf?src-supplier=Digi-Key, ComponentLink4Description=http://www.farnell.com/datasheets/2632662.pdf?src-supplier=Element14, ComponentLink4URL=http://www.farnell.com/datasheets/2632662.pdf?src-supplier=Element14, ComponentLink5Description=https://www.invensense.com/wp-content/uploads/2016/06/App-Note-eMD-20x48-User-Guide.pdf?src-supplier=Avnet, ComponentLink5URL=https://www.invensense.com/wp-content/uploads/2016/06/App-Note-eMD-20x48-User-Guide.pdf?src-supplier=Avnet, ComponentLink6Description=https://www.invensense.com/wp-content/uploads/2016/06/App-Note-eMD-20x48-User-Guide.pdf?src-supplier=Component+Distributors+Inc., ComponentLink6URL=https://www.invensense.com/wp-content/uploads/2016/06/App-Note-eMD-20x48-User-Guide.pdf?src-supplier=Component+Distributors+Inc., Manufacturer Part Number=ICM-20948, Mount="Surface Mount", Output Type=SPI,I2C, Packaging="Tape and Reel", Pricing 1="5000=3.86240, 10000=3.80800, 20000=3.69920, 30000=3.61760, 40000=3.48160, 50000=3.40000, 500000=3.31840 (USD)", RoHS=Yes, RoHS Compliant=Yes, Sensor Type=Accelerometer,Gyroscope,Magnetometer, Supplier 1=Avnet, Supplier Part Number 1=ICM-20948
U6: "SENSOR OPT 550NM AMBIENT 6SMD", Case/Package=SMD/SMT, Manufacturer="Vishay Semiconductors", Max Operating Temperature=85°C, Min Operating Temperature=-25°C, Supplier Part Number 1=VEML6030-GS15CT-ND, Category=Sensors, ComponentLink1Description=http://www.vishay.com/docs/84366/veml6030.pdf?src-supplier=Digi-Key, ComponentLink1URL=http://www.vishay.com/docs/84366/veml6030.pdf?src-supplier=Digi-Key, Manufacturer Part Number=VEML6030-GS15, Mount="Surface Mount", Output Type=I2C, Packaging="Tape and Reel", Pricing 1="1=2.00000, 5=1.89000, 10=1.62000, 25=1.29600, 50=1.18800, 100=1.08000, 500=0.94500, 1000=0.83700, 5000=0.78300 (USD)", RoHS=Yes, RoHS Compliant=Yes, Stock 1=1250, Supplier 1=Digi-Key, Wavelength=550nm
U7: "Realtek RTL8723BU Combo Module"
U8: "NXP - PCA9534BS3,118 - I/O EXPANDER, 8BIT, 400KHZ, HVQFN-16", Frequency=400kHz, Manufacturer="NXP Semiconductors", Max Operating Temperature=85°C, Max Power Dissipation=200mW, Min Operating Temperature=-40°C, Operating Supply Voltage=5.5V, Output Current=50mA, Package Quantity=1, Supplier Part Number 1=568-8706-1-ND, Category="Interface ICs", ComponentLink1Description=https://datasheet.ciiva.com/1780/pca9534-1780006.pdf?src-supplier=Digi-Key, ComponentLink1URL=https://datasheet.ciiva.com/1780/pca9534-1780006.pdf?src-supplier=Digi-Key, ComponentLink2Description=https://datasheet.ciiva.com/1780/pca9534-1780007.pdf?src-supplier=Digi-Key, ComponentLink2URL=https://datasheet.ciiva.com/1780/pca9534-1780007.pdf?src-supplier=Digi-Key, ComponentLink3Description=https://datasheet.ciiva.com/1780/pca9534-1780008.pdf?src-supplier=Digi-Key, ComponentLink3URL=https://datasheet.ciiva.com/1780/pca9534-1780008.pdf?src-supplier=Digi-Key, Interface=I2C,SMBus,Serial, Lead Free="Lead Free", Manufacturer Part Number=PCA9534BS3,118, Max Frequency=400kHz, Mount="Surface Mount", Number of I/Os=8, Number of Pins=16, Packaging="Tape and Reel", Pricing 1="1=1.61000, 10=1.48200 (USD)", RoHS=Yes, RoHS Compliant=Yes, Series=-, Stock 1=1204, Supplier 1=Digi-Key
U9: "SOT-23-5 PMIC - Power Distribution Switches RoHS", Manufacturer="Silergy Corp", Package=SOT-23-5, Manufacturer Part No=SY6280AAC
U10: "USB 2.0 Hub Controller"
U12: "IC TRANSCEIVER FULL 2/2 20TSSOP", Manufacturer=MaxLinear, Supplier Part Number 1=1016-1794-1-ND, Category="Interface ICs", Manufacturer Part Number=SP3222EEY-L/TR, Pricing 1="1=1.75000, 10=1.57600, 25=1.48680, 100=1.26660, 250=1.18932, 500=1.04066, 1000=0.86226 (USD)", RoHS=Yes, RoHS Compliant=Yes, Stock 1=1669, Supplier 1=Digi-Key
U13: Manufacturer=ZUCZUG, Package=QFN-8, Manufacturer Part No=ETA3451D2I-T
U14: "IC REG BOOST ADJ 2.7A TSOT23-6", Case/Package=SOT-23-6, Manufacturer="Monolithic Power Systems", Max Input Voltage=6V, Max Operating Temperature=125°C, Max Output Current=2.7A, Min Input Voltage=2.5V, Min Operating Temperature=-40°C, Min Output Voltage=3V, Operating Supply Current=270uA, Package Quantity=3000, Supplier Part Number 1=1589-1909-1-ND, Switching Frequency=1.2MHz, Category="Voltage Regulators - Switching", ComponentLink1Description=http://www.mouser.com/ds/2/277/MP3221_r1.0-371792.pdf?src-supplier=Mouser, ComponentLink1URL=http://www.mouser.com/ds/2/277/MP3221_r1.0-371792.pdf?src-supplier=Mouser, ComponentLink2Description=https://www.monolithicpower.com/Lists/Product_NonSynchronous%20Switcher_5745/DispForm.aspx?ID=24&src-supplier=Avnet, ComponentLink2URL=https://www.monolithicpower.com/Lists/Product_NonSynchronous%20Switcher_5745/DispForm.aspx?ID=24&src-supplier=Avnet, ComponentLink3Description=https://www.monolithicpower.com/Lists/Product_NonSynchronous%20Switcher_5745/DispForm.aspx?ID=24&src-supplier=Avnet+Asia, ComponentLink3URL=https://www.monolithicpower.com/Lists/Product_NonSynchronous%20Switcher_5745/DispForm.aspx?ID=24&src-supplier=Avnet+Asia, ComponentLink4Description=http://www.monolithicpower.com/DesktopModules/DocumentManage/API/Document/getDocument?id=891&src-supplier=Digi-Key, ComponentLink4URL=http://www.monolithicpower.com/DesktopModules/DocumentManage/API/Document/getDocument?id=891&src-supplier=Digi-Key, Lead Free="Lead Free", Manufacturer Part Number=MP3221GJ-Z, Max Output Voltage=6V, Min Supply Voltage=2.5V, Mount="Surface Mount", Number of Outputs=1, Number of Pins=6, Operating Supply Voltage=6V, Output Configuration=Positive, Output Current=2.7A, Output Type=Adjustable, Output Voltage=6V, Packaging="Tape and Reel", Pricing 1="1=1.97000, 10=1.77000, 25=1.66960, 100=1.33560, 250=1.16864, 500=1.13526, 1000=0.90153 (USD)", Radiation Hardening=No, RoHS=Yes, RoHS Compliant=Yes, Stock 1=2434, Supplier 1=Digi-Key, Synchronous Rectifier=No, Topology=Boost
X1: "CRYSTAL 12.0000MHZ 18PF SMD", Case/Package=SMD/SMT, ESR (Equivalent Series Resistance)=150R, Frequency=12MHz, Frequency Stability=30ppm, Load Capacitance=18pF, Manufacturer=TXC, Max Operating Temperature=70°C, Min Operating Temperature=-20°C, Package Quantity=1, Supplier Part Number 1=717-8Z-12.000MAAJ-T, Category=Crystals, ComponentLink1Description=https://datasheet.ciiva.com/28498/1838674-28498900.pdf?src-supplier=Element14, ComponentLink1URL=https://datasheet.ciiva.com/28498/1838674-28498900.pdf?src-supplier=Element14, ComponentLink2Description=https://datasheet.ciiva.com/4950/8z-12784-4950167.pdf?src-supplier=Mouser, ComponentLink2URL=https://datasheet.ciiva.com/4950/8z-12784-4950167.pdf?src-supplier=Mouser, ComponentLink3Description=https://datasheet.ciiva.com/859/8z-859073.pdf?src-supplier=Digi-Key, ComponentLink3URL=https://datasheet.ciiva.com/859/8z-859073.pdf?src-supplier=Digi-Key, ComponentLink4Description=https://datasheet.ciiva.com/859/8z-859071.pdf?src-supplier=Digi-Key, ComponentLink4URL=https://datasheet.ciiva.com/859/8z-859071.pdf?src-supplier=Digi-Key, ComponentLink5Description=https://datasheet.ciiva.com/859/8z-859072.pdf?src-supplier=Digi-Key, ComponentLink5URL=https://datasheet.ciiva.com/859/8z-859072.pdf?src-supplier=Digi-Key, ComponentLink6Description=https://datasheet.ciiva.com/8047/1041872-8047871.pdf?src-supplier=Element14, ComponentLink6URL=https://datasheet.ciiva.com/8047/1041872-8047871.pdf?src-supplier=Element14, Depth=2mm, Frequency Tolerance=30ppm, Height=0.022inch, Length=2.5mm, Manufacturer Part Number=8Z-12.000MAAJ-T, Mount="Surface Mount", Number of Pins=4, Packaging="Tape and Reel", Pricing 1="1=1.41000, 10=1.36000, 50=1.33000, 100=1.13000, 1000=0.93000, 10000=0.78000 (USD)", REACH SVHC="No SVHC", RoHS=Yes, RoHS Compliant=Yes, Series=8Z, Stock 1=33, Supplier 1=Mouser, Termination=SMD/SMT, Tolerance=30ppm, Width=0.079inch

## Free pads (board coordinates)
  round 105 hole 55 square: MH1(2,3907) MH2(3697,3907) MH3(3697,-1) MH4(2,-1)

## Via types
v1: diameter 15.75, hole 7.87, Top Layer to Bottom Layer, tented both sides, 264 vias
v2: diameter 23.62, hole 11.81, Top Layer to Bottom Layer, tented both sides, 101 vias
v3: diameter 31.5, hole 11.81, Top Layer to Bottom Layer, tented both sides, 73 vias
v4: diameter 62.99, hole 31.5, Top Layer to Bottom Layer, tented both sides, 7 vias

## Nets (pads, with @x,y where several pads share a name; then routed paths per layer and width w, separated by ;. In a path a pad name is that pad's centre, name@x,y a point inside that pad or via, vN(x,y) a via of type N, cw(c..) or ccw(c..) an arc to the next point about the centre after c; other vN are vias at no path point)
3G_POWER.PWR_ON: SB9.1 U4.162 | length 86.4
  Top Layer w20: SB9.1@2303,2347 2388,2347 2389,2346
3G_POWER.RESET: SB10.1 U4.163
5V_IN: C49.1 C50.1 D6.1 J6.1 SB1.2 | length 418.5
  Top Layer w25: J6.1@537.41,3533.84 539.57,3536 SB1.2@759,3536
  Bottom Layer w20: D6.1@500,3578.52 500,3632 518.19,3650.19 C49.1@635,3650.19
  other v4: 416,3515
232RXD1: J19.1 U12.16 | length 1757.1
  Top Layer w12: v2(2116,733) 2142,759 2142,816.17 2192.2,866.38 U12.16@2192.2,908.25
  Bottom Layer w12: J19.1@981.2,310 1044.2,247 1481,247 1517,283 1517,604 1646,733 v2(2116,733)
232TXD1: J18.2 U12.17 | length 1187.4
  Top Layer w12: v2(2116,772) 2116,821 2166.61,871.61 U12.17@2166.61,908.25
  Bottom Layer w12: J18.2@1457.04,310 1457.04,617.04 1612,772 v2(2116,772)
BAT: D2.1 J26.1 | length 113
  Top Layer w25: J26.1@325,-19 v3(396,-19)
  Bottom Layer w25: D2.1@354.01,-19 v3(396,-19)
CAM1_IO0: J4.17 U8.7
CAM1_IO1: J4.18 U8.8
CAM_1.8V: C31.1 C32.1 J3.11 R24.2 U4.59 | length 2126.8
  Top Layer w10: J3.11@-30.95,1893.47 40.53,1893.47 v1(41,1893)
  Top Layer w20: v1(202,2401) 509,2708 509,2919 546.38,2956.38 623.62,2956.38 671,2909 872,2909 1041,3078 v1(1041,3097)
  Bottom Layer w10: v1(41,1893) 49,1885 R24.2@61.17,1885
  Bottom Layer w20: C31.1@42,1926 42,2241 v1(202,2401) ; v1(1041,3097) 1180,3097 1191.28,3108.28 1191.28,3141.94
CAM_2.8V: C29.1 C30.1 J3.4 U4.58 | length 2367.7
  Top Layer w8: J3.4@-30.95,1755.68 -30.27,1755 18.82,1755 v1(27.82,1746)
  Top Layer w20: v1(27.82,1746) v1(237,1746) ; v1(276,2384) 685.04,2793.04 794.94,2793.04 828.9,2827 v1(863,2827) ; v1(944,2812) 944,2826.72 1148,3030.72 v1(1148,3183)
  Bottom Layer w8: v1(27.82,1746) 37.82,1756 C29.1@62,1756
  Bottom Layer w20: v1(237,1746) 237,2345 v1(276,2384) ; v1(863,2827) 929,2827 v1(944,2812) ; 1147.97,3141.94 v1(1148,3183)
  Bottom Layer w25: C30.1@62,1707 C29.1@62,1756
CAM_CLK: J3.17 U4.130 | length 3326.4
  Top Layer w10: J3.17@-30.95,2011.58 342.42,2011.58 491,1863 491,1700 v1(467,1676) ; v1(467,1618) 518,1618 530,1630 572,1630 602,1600 602,1467.55 722.55,1347 988,1347 v1(1004,1363)
  Bottom Layer w10: v1@466,1618 467,1619 v1(467,1676) ; v1@1003,1363 1003,1425 1044,1466 2431,1466 2475.05,1510.05 2649.94,1510.05
CAM_D0: J3.19 U4.131 | length 3417.3
  Top Layer w10: J3.19@-30.95,2050.95 356.65,2050.95 495.6,1912 v1(705,1912) ; v1(814,1556) 809.13,1551.13 730.13,1551.13 700,1521 700,1433 751,1382 944,1382 979,1417 v1(1025,1417)
  Bottom Layer w10: v1(705,1912) 814,1803 v1(814,1556) ; v1(1025,1417) 1055,1447 2440,1447 2459.74,1466.74 2649.94,1466.74
CAM_D1: J3.21 U4.132 | length 4345
  Top Layer w10: J3.21@-30.95,2090.32 304.32,2090.32 v1(327,2113) ; v1(526,1259) 526,1118.96 628.96,1016 v1(2486,1016)
  Bottom Layer w10: v1(327,2113) 295,2081 295,1698.96 213,1616.96 213,1351.46 305.46,1259 v1(526,1259) ; v1(2486,1016) 2679,1016 2689,1026 ; 2649.94,1423.43 2682.57,1423.43 2733,1373 2733,1069.96 2690.04,1027
CAM_D2: J3.22 U4.133 | length 4287.5
  Top Layer w10: J3.22@-30.95,2110.01 275.46,2110.01 v1(300.45,2135) ; v1(552,1254) 552,1117 636,1033 2441,1033 2451,1043 v1(2486,1043)
  Bottom Layer w10: v1(300.45,2135) 278,2112.55 278,1706 196,1624 196,1343 301,1238 536,1238 v1(552,1254) ; v1(2486,1043) 2682,1043 2716,1077 2716,1348 2683.87,1380.13 2649.94,1380.13
CAM_D3: J3.20 U4.134 | length 4160.9
  Top Layer w10: J3.20@-30.95,2070.64 330.64,2070.64 343,2083 v1(363,2083) ; v1(504,1288) 546.11,1288 579,1255.11 579,1114.04 642.04,1051 2135,1051 2153,1069 v1(2486,1069)
  Bottom Layer w10: v1(363,2083) 335.53,2055.53 335.53,2052 335.87,1862.13 335.87,1752.54 314,1730.67 314,1691.5 231,1608.5 231,1357.5 300.5,1288 v1(504,1288) ; v1(2486,1069) 2677,1069 2699,1091 2699,1324 2686.18,1336.82 2649.94,1336.82
CAM_D4: J3.18 U4.135 | length 3470.1
  Top Layer w10: J3.18@-30.95,2031.27 349.73,2031.27 498.02,1882.98 691,1882.98 v1(694,1883) ; v1(789,1571) 708,1571 679,1542 679,1414.59 729.59,1364 962,1364 982,1384 v1(1038,1384)
  Bottom Layer w10: v1(694,1883) 789,1788 v1(789,1571) ; v1(1038,1384) 1038,1399 1067,1428 2447,1428 2581.49,1293.51 2649.94,1293.51
CAM_D5: J3.16 U4.136 | length 3349.9
  Top Layer w8: v1(470.87,1513.13) 484,1500 522.88,1500 751.88,1271 896.79,1271 954.66,1328.87 1036.87,1328.87 1068,1360 v1(1068,1396)
  Top Layer w10: J3.16@-30.95,1991.9 -29.95,1992.9 328.94,1992.9 474,1847.84 474,1715 443,1684 v1(443,1664)
  Bottom Layer w10: v1(443,1664) 443,1541 v1(470.87,1513.13) ; v1@1067.5,1396.5 1082,1411 2436.04,1411 2596.84,1250.2 2649.94,1250.2
CAM_D6: J3.14 U4.137 | length 3510
  Top Layer w8: v1(528,1365) 611.21,1365 735.21,1241 914,1241 968,1295 v1(1047,1295)
  Top Layer w10: J3.14@-30.95,1952.53 -30.76,1952.34 342.66,1952.34 456,1839 456,1726 421,1691 v1(421,1649)
  Bottom Layer w10: v1(421,1649) 410,1638 410,1355 428,1337 500,1337 v1(528,1365) ; v1@1047,1302 1047,1344.11 1096.89,1394 2429,1394 2616.1,1206.9 2649.94,1206.9
CAM_D7: J3.12 U4.138 | length 3359.1
  Top Layer w8: v1(390,1484) 517.67,1484 745.67,1256 903,1256 960.87,1313.87 1044.87,1313.87 v1(1096,1365)
  Top Layer w10: J3.12@-30.95,1913.16 -30.26,1913.85 323.04,1913.85 439,1797.89 439,1734 390,1685 v1(390,1648)
  Bottom Layer w10: v1(390,1484) v1(390,1648) ; v1@1096.5,1364.5 1109,1377 2420,1377 2633.41,1163.59 2663.94,1163.59
CAM_H: J3.9 U4.128 | length 3343.5
  Top Layer w10: J3.9@-30.95,1854.1 314.9,1854.1 v1(315,1854) ; v1(315,1774) 247,1706 247,1572.5 282.14,1537.36 508.15,1537.36 752.51,1293 v1(882,1293)
  Bottom Layer w10: v1(315,1774) v1(315,1854) ; v1(882,1293) 882,1367 1022,1507 2414,1507 2503.66,1596.66 2649.94,1596.66
CAM_PD: J3.8 U4.139 | length 3547.5
  Top Layer w8: v1(517,1320) 517,1322.69 541.18,1346.87 608.13,1346.87 731,1224 922,1224 973.87,1275.87 1070.87,1275.87 1102.89,1307.89 v1(1102.89,1332)
  Top Layer w10: J3.8@-30.95,1834.42 -30.66,1834.13 v1@356,1834.13
  Bottom Layer w10: v1(356,1834.42) 356,1748.63 331,1723.63 331,1684.46 248,1601.46 248,1364.54 292.54,1320 v1(517,1320) ; v1(1102.89,1332) 1130.89,1360 2412,1360 2620.41,1151.59 2620.41,1117.06
CAM_PN: J3.24 R27.2 U4.141 | length 3807.8
  Top Layer w10: J3.24@-30.95,2149.38 v1@196,2149.38 ; v1(150,1642) 153,1642 v1(214,1703)
  Top Layer w12: v1(602,1228) 675.04,1154.96 972.96,1154.96 997,1179 v1(1103,1179)
  Bottom Layer w8: R27.2@102.83,1642 v1(150,1642)
  Bottom Layer w10: v1(196,2149) 214,2131 v1(214,1703) ; v1(1103,1179) 1104.87,1180.87 1104.87,1268.87 1163.87,1327.87 2392.13,1327.87 2533.8,1186.2 2533.8,1134.06
  Bottom Layer w12: v1(150,1642) 178,1614 178,1335.54 295.54,1218 592,1218 v1(602,1228)
CAM_RST: J3.6 U4.140 | length 3400.8
  Top Layer w8: J3.6@-30.95,1795.05 -28.95,1797.05 318.64,1797.05 374,1741.69 v1(374,1705) ; v1(340,1580) 571,1580 v1@572,1579 ; v1(569,1294) 691.04,1171.96 954.96,1171.96 986,1203 v1(1085,1203)
  Bottom Layer w8: v1(340,1580) 340,1648 374,1682 v1(374,1705) ; v1@573,1294 v1(573,1579) ; v1(1085,1203) 1085,1276 1153,1344 2400,1344 2577.1,1166.9 2577.1,1134.06
CAM_SIG.CAM_V: J3.7 U4.129 | length 3602.8
  Top Layer w8: J3.7@-30.95,1814.73 v1(377.05,1814.73) ; v1(273,1583) 297,1559 v1@549,1559 ; v1@549,1328 v1(553,1328) 600.11,1328 720.11,1208 935.13,1208 v1(984.13,1257)
  Bottom Layer w8: v1(273,1583) 273,1603.83 347,1677.83 347,1717 377.05,1747.05 v1(377.05,1814.73)
  Bottom Layer w10: v1(553,1328) v1(553,1559) ; v1(984.13,1257) v1@984.13,1258.87 ; v1@986,1257 v1@984.13,1258.87 ; 2649.94,1553.35 2489.35,1553.35 2425,1489 1034,1489 984.13,1439.13 v1@984.13,1258.87
DC5V_OTG: C58.1 C59.1 J21.1 U4.17 U9.1 | length 5144.8
  Top Layer w10: v1(765,1489) 841,1489 850,1480 v1(880,1480)
  Top Layer w20: v1(2082,1847) 2123,1847 2273,1997 v1(2786,1997) ; v3(2972,3379) 3090,3497 3090,3730 v2@3140,3730 ; J21.1@3089.8,3761.73 J21.1@3089.8,3772.7
  Bottom Layer w10: 642.06,1856.5 693.5,1856.5 765,1785 v1(765,1489)
  Bottom Layer w20: v1(880,1480) 960,1480 1040,1560 1040,2074.44 1093.56,2128 1801,2128 v1(2082,1847) ; v1(2786,1997) 2786,3190.69 2972,3376.69 v3(2972,3379) ; U9.1@3090.21,3701.37 U9.1@3092.58,3699
  other v2: 3146,3725
DCIN: SB1.1 U4.55 U4.56 | length 590.4
  Top Layer w25: SB1.1@819,3536 938,3536 1018,3456 v3(1018,3196)
  Bottom Layer w25: v3@1016,3196 1018.05,3193.95 1018.05,3141.94 1061.35,3141.94
ELDO3: C16.1 C17.1
EXP_INT: U4.165 U8.11
FB: C86.2 R126.1 R127.1 U13.4 | length 45.6
  Top Layer w10: C86.2@874.5,3460.5 C86.2@874.5,3468 ; U13.4@886.42,3431.57 922.75,3431.57 R127.1@924,3432.83
FLIGHTMODE: U3.54 U8.5
GATE1: C40.1 Q5.3 Q6.1 R133.1 | length 496.6
  Top Layer w12: R133.1@3591.83,3099 3591.83,3084.94 Q6.1@3620.4,3056.37 3620.4,3142.6 3595,3168 3548,3168 3505,3211 3505,3292 3536.37,3323.37 Q5.3@3592.67,3323.37
  Bottom Layer w12: C40.1@3592.81,3100 3612,3100 v1(3620,3092)
GATE2: Q3.1 Q4.3 R18.1 | length 253.1
  Top Layer w12: Q4.3@1532,2899.37 1632.63,2899.37 1659.6,2872.4 Q3.1@1659.6,2820.63 1659.6,2785.4 1671,2774 R18.1@1682.17,2774
GND: C1.2 C2.2 C3.2 C4.2 C5.2 C6.2 C7.2 C8.1 C9.2 C10.1 C13.2 C14.2 C15.2 C16.2 C17.2 C18.2 C19.2 C20.2 C21.2 C22.2 C23.2 C24.2 C25.2 C26.2 C27.1 C28.2 C29.2 C30.2 C31.2 C32.2 C33.1 C34.1 C35.2 C36.1 C37.1 C38.1 C39.1 C41.2 C49.2 C50.2 C51.2 C52.2 C53.2 C54.2 C57.2 C58.2 C59.2 C60.2 C61.2 C62.2 C63.2 C64.2 C65.1 C66.1 C77.2 C78.2 C80.2 C81.2 C83.2 C84.2 C85.2 C87.2 C88.2 C89.2 C90.2 C91.2 D3.2 D6.2 D7.2 D9.2 D10.2 D11.2 J2.1 J3.2 J3.15 J3.MP1 J3.MP2 J4.1 J4.4 J4.7 J4.10 J4.13 J4.16 J4.19 J4.MP1 J4.MP2 J5.2 J5.3 J6.3 J7.1 J8.2 J9.6 J9.MP1 J9.MP2 J9.MP3 J9.MP4 J12.4 J15.C5 J15.MP1 J15.MP2 J15.MP3 J15.MP4 J15.MP5 J15.MP6 J17.2 J19.2 J20.3 J20.29 J20.36 J20.41 J20.42 J20.MP1 J20.MP2 J21.5 J22.2 J22.3 J23.2 J23.3 J26.2 L1.2 Q1.2 Q2.2 Q4.2 Q5.2 Q7.2 R3.2 R7.1 R11.2 R16.2 R19.2 R23.1 R66.2 R68.2 R70.1 R71.1 R75.2 R97.2 R99.2 R101.2 R103.2 R127.2 R130.1 R132.2 R135.2 SW1.1 SW2.1 SW3.1 SW4.1 SW5.1 SW6.1 U1.12 U1.24 U1.28 U1.33 U2.2 U3.1 U3.2 U3.5 U3.10 U3.14 U3.37 U3.40 U3.41 U3.43 U3.57 U3.58 U3.60 U3.61 U3.64 U3.65 U3.77 U3.78 U3.80 U4.51 U4.52 U4.90 U4.101 U4.184 U5.9 U5.11 U5.18 U5.20 U5.25 U6.1 U6.4 U7.4 U7.5 U8.1 U8.6 U8.15 U8.16 U8.17 U9.2 U10.15 U11.2 U12.1 U12.18 U13.2 U13.3 U13.9 U14.2 X1.2 X1.4 | length 39857.5
  Top Layer w10: -37,3280 -37,3245 -28,3236 ; J3.2@-30.95,1716.31 -5.41,1716.31 49.69,1661.2 J3.MP1@49.69,1635.69 ; J3.15@-30.95,1972.21 v1(72,1972.21) ; J20.3@-23,2478.08 7.99,2478.08 45,2441.06 J20.MP1@45,2387 ; J20.29@-23,2989.89 -22.81,2989.7 52.7,2989.7 117.87,3054.87 117.87,3113.13 85,3146 ; J20.36@-23,3127.69 66.68,3127.69 85,3146 ; J20.MP1@43.93,2372.96 J20.MP1@44.84,2372.05 ; 85,3169 85,3146 ; U13.9@850,3405 U13.9@858.86,3396.14 ; v1(1360,591) R23.1@1360,629